# EAGLE board Exquisite Fyyran-Bombul (EAGLE 9.7.0)

Size 260.34 x 254.33 mm. Coordinates in mm from the lower left corner, seen from the top.
Outline: 0,0 260.34,0 260.34,254.33 0,254.33 0,0
Copper layers (1*16): Top 0.035mm / dielectric 1.5mm / Bottom 0.035mm
Design rules "default": minimum track width 6mil, minimum drill 0.35mm, track to track 6mil, track to pad 6mil, pad to pad 6mil, via to via 6mil, smd to smd 6mil, copper to edge 40mil, drill to drill 6mil, minimum pad ring 10mil, minimum via ring 8mil, stop-mask expansion 4mil, vias tented up to drill 0mil, thermal gap 10mil

## Footprints (pad centres in the part's own frame; a part is rotated, then mirrored left to right if it is on the bottom)
LED-RGB-5MM = drill 0.9: B 0.635,0.635; C -0.635,-0.635; G 1.905,-0.635; R -1.905,0.635
MQ-XX-SOCKET = drill 1.27: 1 -6.223,6.223; 2 -8.788,0; 3 -6.223,-6.223; 4 6.223,-6.223; 5 8.788,0; 6 6.223,6.223
PIEZO = drill 1 pad 1.6: 1 -3.5,0; 2 3.5,0
RESAD1016W63L850D250B = drill 0.83 pad 1.43: 1 -5.08,0; 2 5.08,0
ARDUINO-UNO-R3-SHIELD = drill 1.016 pad 1.88: 3.3V 24.13,-2.54; 5V 24.13,0; A0 24.13,12.7; A1 24.13,15.24; A2 24.13,17.78; A3 24.13,20.32; A4 24.13,22.86; A5 24.13,25.4; AREF -24.13,-13.97; D2 -24.13,20.32; D3 -24.13,17.78; D4 -24.13,15.24; D5 -24.13,12.7; D6 -24.13,10.16; D7 -24.13,7.62; D8 -24.13,3.81; D9 -24.13,1.27; D10 -24.13,-1.27; D11 -24.13,-3.81; D12 -24.13,-6.35; D13 -24.13,-8.89; GND@0 24.13,2.54; GND@1 24.13,5.08; GND@2 -24.13,-11.43; IOREF 24.13,-7.62; NC 24.13,-10.16; RES 24.13,-5.08; RX -24.13,25.4; SCL -24.13,-19.05; SDA -24.13,-16.51; TX -24.13,22.86; VIN 24.13,7.62
TO92 = drill 0.813 octagon: 1 -1.27,0; 2 0,1.905; 3 1.27,0
JHD-162A = drill 1.016 long: 1 -19.05,0; 2 -16.51,0; 3 -13.97,0; 4 -11.43,0; 5 -8.89,0; 6 -6.35,0; 7 -3.81,0; 8 -1.27,0; 9 1.27,0; 10 3.81,0; 11 6.35,0; 12 8.89,0; 13 11.43,0; 14 13.97,0; 15 16.51,0; 16 19.05,0

## Placement (x,y rotation side)
D1  LED-RGBRCBG-PTH  [LED-RGB-5MM]  155.75,102.93 0 top
D2  LED-RGBRCBG-PTH  [LED-RGB-5MM]  69.52,246.83 0 top
GAS1  GAS-SENSORMQ-XX-SOCKET  [MQ-XX-SOCKET]  14.22,154.43 90 top
PIEZO1  PIEZO  [PIEZO]  85.53,125.31 0 top
R1  10k  [RESAD1016W63L850D250B]  53.78,125.31 0 top
R2  220  [RESAD1016W63L850D250B]  232.53,59.96 0 top
R3  220  [RESAD1016W63L850D250B]  232.53,80.28 0 top
R4  220  [RESAD1016W63L850D250B]  245.23,62.5 0 top
R5  220  [RESAD1016W63L850D250B]  91.88,104.99 0 top
R6  220  [RESAD1016W63L850D250B]  96.96,122.77 0 top
R7  220  [RESAD1016W63L850D250B]  71.03,223.39 0 top
R8  220  [RESAD1016W63L850D250B]  86.27,225.93 0 top
R9  220  [RESAD1016W63L850D250B]  55.79,223.39 0 top
U1  ARDUINO-UNO-R3-SHIELD  [ARDUINO-UNO-R3-SHIELD]  152.53,159.16 270 top
U2  TMP36GT9Z_TO92  [TO92]  33.46,125.31 0 top
U3  LCD-16X2JHD-162A  [JHD-162A]  204.71,36.63 0 top

## Library data of the parts
D1 D2 GAS1 PIEZO1 R1-R9 U1-U3 = Tinkercad

## Nets
D1_B: D1.B R4.1
D1_G: D1.G R5.2
D1_R: D1.R R3.1
D2_B: D2.B R8.1
D2_G: D2.G R9.1
D2_R: D2.R R7.1
PIEZO1_2: PIEZO1.2 R6.1
U1_5V: GAS1.1 GAS1.2 GAS1.3 R2.2 U1.5V U2.3 U3.2
U1_A0: U1.A0 U2.2
U1_A1: GAS1.4 GAS1.6 R1.1 U1.A1
U1_D2: U1.D2 U3.14
U1_D3: U1.D3 U3.13
U1_D4: U1.D4 U3.12
U1_D5: U1.D5 U3.11
U1_D6: U1.D6 U3.6
U1_D7: U1.D7 U3.4
U1_D8: PIEZO1.1 U1.D8
U1_D9: R3.2 U1.D9
U1_D10: R4.2 U1.D10
U1_D11: R5.1 U1.D11
U1_D12: R8.2 U1.D12
U1_D13: R7.2 U1.D13
U1_GND: D1.C D2.C GAS1.5 R1.2 R6.2 U1.GND@0 U1.GND@1 U1.GND@2 U2.1 U3.1 U3.3 U3.5 U3.16
U1_TX: R9.2 U1.TX
U3_LED+: R2.1 U3.15

## Tracks (layer width: path | path; a pad name or v marks a point on that pad's centre or on a via)
D1_B  (1 unrouted)
D1_G  (1 unrouted)
D1_R  (1 unrouted)
D2_B  (1 unrouted)
D2_G  (1 unrouted)
D2_R  (1 unrouted)
PIEZO1_2  (1 unrouted)
U1_5V  (6 unrouted)
U1_A0  (1 unrouted)
U1_A1  (3 unrouted)
U1_D2  (1 unrouted)
U1_D3  (1 unrouted)
U1_D4  (1 unrouted)
U1_D5  (1 unrouted)
U1_D6  (1 unrouted)
U1_D7  (1 unrouted)
U1_D8  (1 unrouted)
U1_D9  (1 unrouted)
U1_D10  (1 unrouted)
U1_D11  (1 unrouted)
U1_D12  (1 unrouted)
U1_D13  (1 unrouted)
U1_GND  (12 unrouted)
U1_TX  (1 unrouted)
U3_LED+  (1 unrouted)